# Altium PCB DAPLink GD32F103RCT6.PcbDoc (part 1 of 2)
Units mil, origin at the board's own origin, x right, y up, seen from the top; angles counter-clockwise.
Board outline 3485 x 2855 mil, 2 copper layers (Top Layer, Bottom Layer); 95 components, 93 nets, 322 pads, 225 vias.
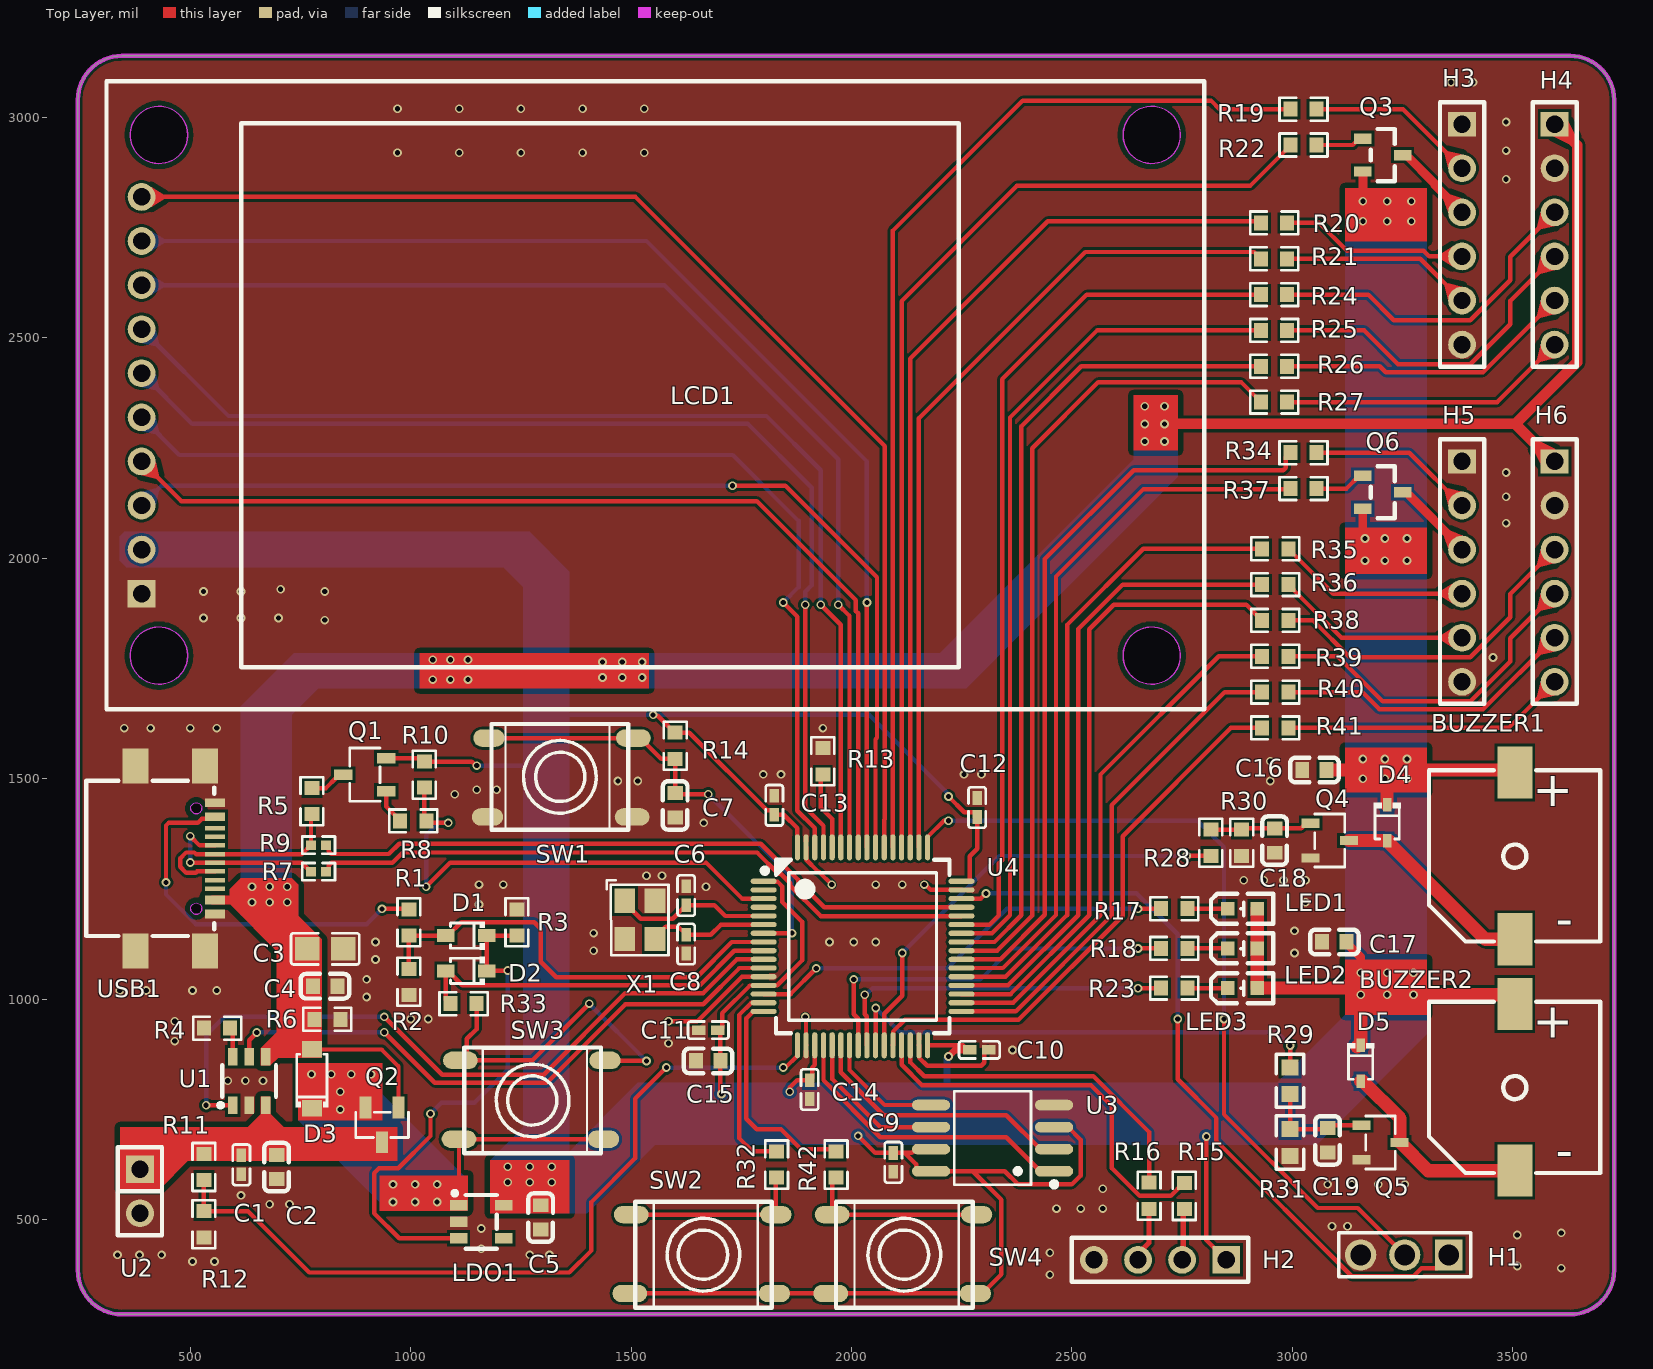
[diagram p0: Top Layer view]
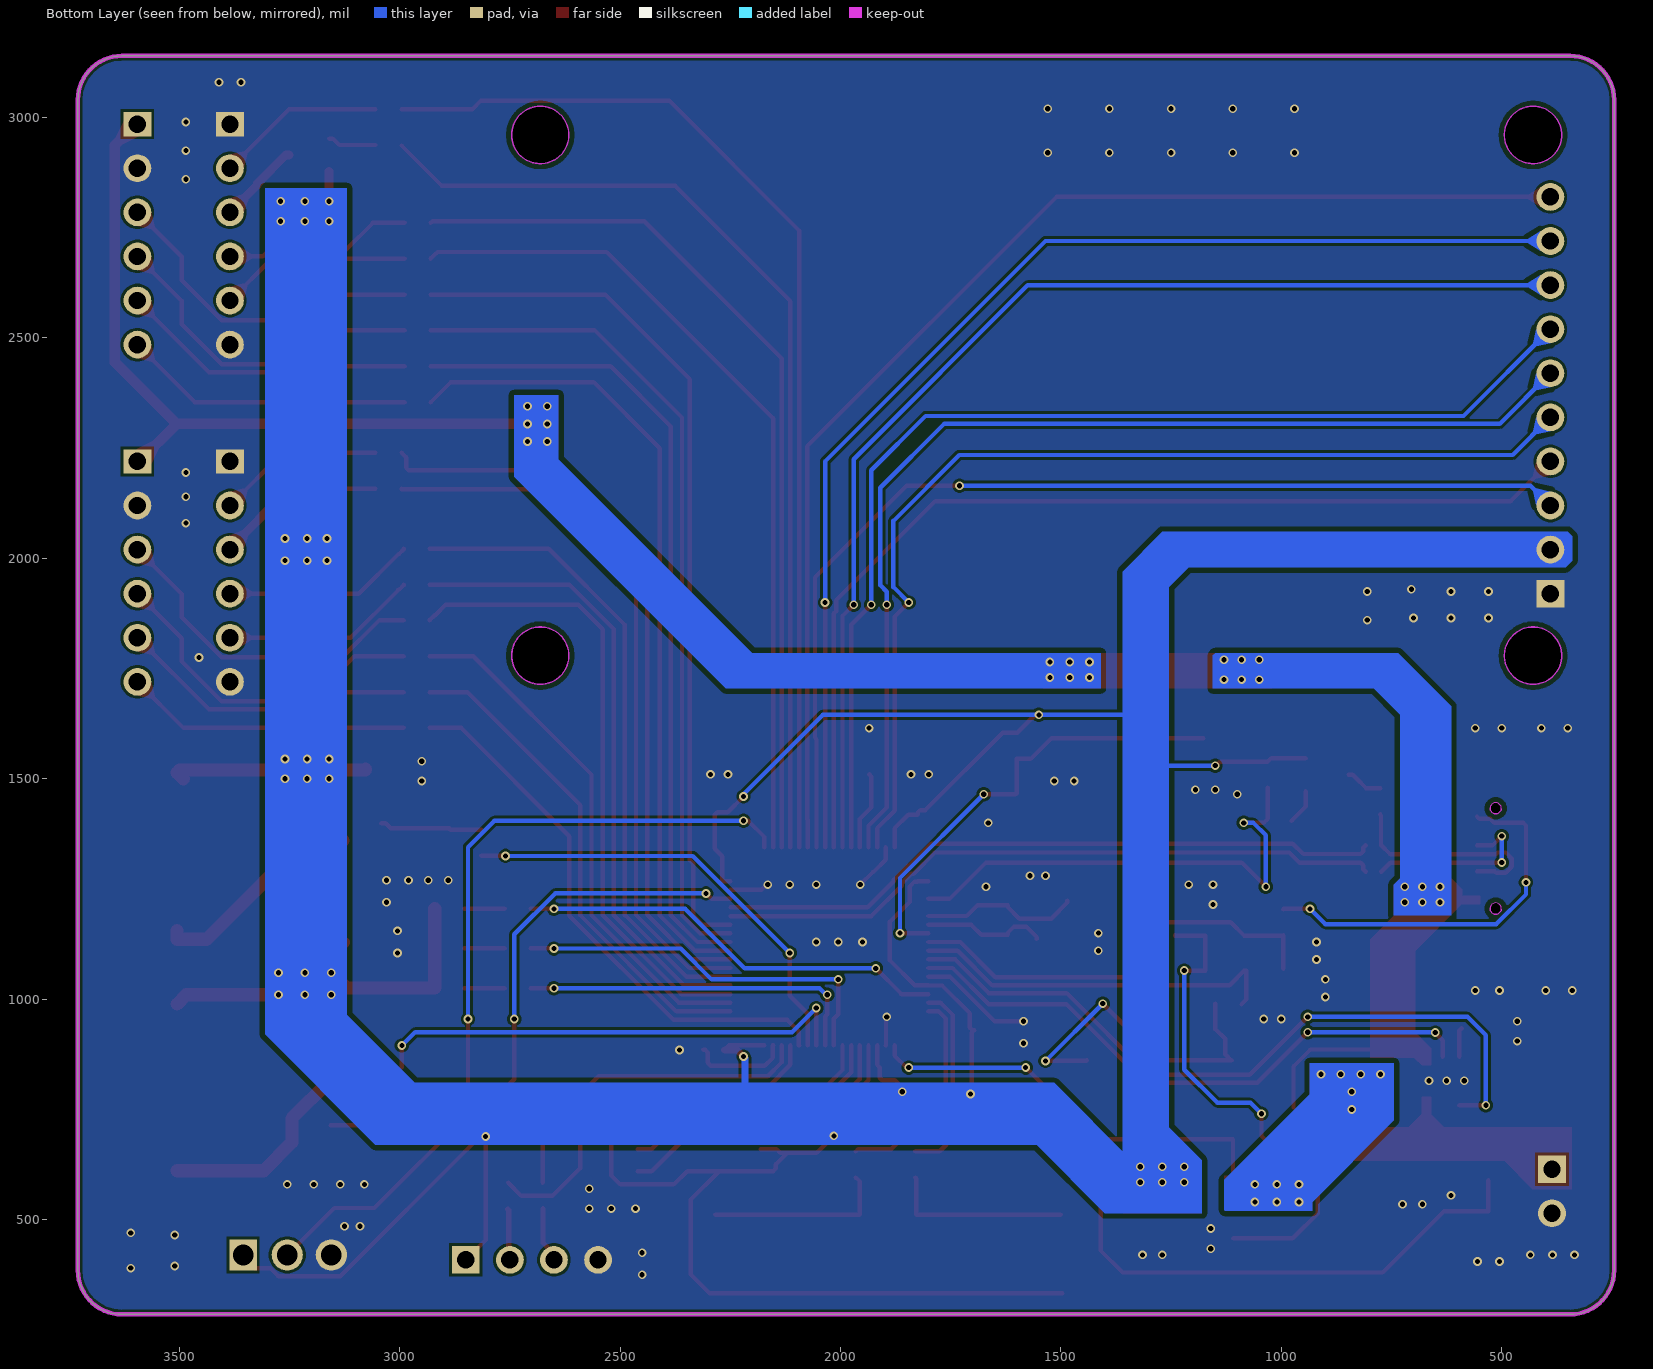
[diagram p1: Bottom Layer view, seen from below]

## Layer stack, top to bottom
Top Solder: solder mask 0.4, Solder Resist, Dk 3.5
Top Layer: signal copper 1.4
Dielectric 1: dielectric 12.6, FR-4, Dk 4.8
Bottom Layer: signal copper 1.4
Bottom Solder: solder mask 0.4, Solder Resist, Dk 3.5

## Board outline
245,385 245,3040 cw(c345,3040) 345,3140 3630,3140 cw(c3630,3040) 3730,3040 3730,385 cw(c3630,385) 3630,285 345,285 cw(c345,385)

## Design rules (kind name [scope] priority, off if disabled: settings)
Clearance Chip [(HasFootprint('USB-C-SMD_TYPE-C-16P-QTGM027') AND HasFootprint('LQFP-64_L10.0-W10.0-P0.50-LS12.0-BL'))] p1: gap=5 ignorepadtopadclearanceinfootprint=TRUE
Clearance [All] p2: gap=6 ignorepadtopadclearanceinfootprint=TRUE except(12: Fill-Fill Fill-Poly Fill-Region Poly-Poly Poly-Region Region-Region)
DiffPairsRouting DiffPair_90oum_DiffPairsRouting [InDifferentialPairClass('90oum')] p1: maxlimit=10 minlimit=7.87 mostfreqgap=10 toplayer_minwidth=10 toplayer_maxwidth=15 toplayer_prefwidth=15 bottomlayer_minwidth=10 bottomlayer_maxwidth=15 bottomlayer_prefwidth=15 maxuncoupledlength=500
DiffPairsRouting [All] p2: maxlimit=10 minlimit=10 mostfreqgap=10 toplayer_minwidth=15 toplayer_maxwidth=15 toplayer_prefwidth=15 bottomlayer_minwidth=15 bottomlayer_maxwidth=15 bottomlayer_prefwidth=15 maxuncoupledlength=500
HoleSize [All] p1: absolutevalues=TRUE maxlimit=248.03 minlimit=7.87 maxpercent=80.000 minpercent=20.000
MatchedLengths DiffPair_90oumMatchedLengths [InDifferentialPairClass('90oum')] p1: tolerance=10 checknetsindiffpair=FALSE checkdiffpairvsdiffpair=TRUE checkxsignals=TRUE checkothers=TRUE
MatchedLengths DiffPair_90oum_MatchedLengths [InDifferentialPairClass('90oum')] p2: tolerance=10 checknetsindiffpair=FALSE checkdiffpairvsdiffpair=TRUE checkxsignals=TRUE checkothers=TRUE
MinimumSolderMaskSliver GD32 [HasFootprint('LQFP-64_L10.0-W10.0-P0.50-LS12.0-BL')] p1: minsoldermaskwidth=3.86
MinimumSolderMaskSliver [All] p2: minsoldermaskwidth=3.94
PolygonConnect [All] p1: connectstyle=Direct reliefconductorwidth=10 reliefentries=4 polygonreliefangle="90 Angle" airgapwidth=10
RoutingVias [All] p1: holewidth=11.81 width=19.68 viastyle="Through Hole" minholewidth=11.81 minwidth=19.68 maxholewidth=28 maxwidth=50
SilkToSolderMaskClearance [IsPad] p1: minsilkscreentomaskgap=4 clearancetoexposedcopper=TRUE
SolderMaskExpansion "Via Mask" [IsVia] p1: expansion=4 istentingtop=TRUE
SolderMaskExpansion [All] p2: expansion=4 istentingtop=FALSE
SupplyNets "Schematic Supply Nets_4" [InNet('GND')] p1: voltage=0.000
SupplyNets "Schematic Supply Nets_3" [InNet('3.3V')] p2: voltage=0.000
SupplyNets "Schematic Supply Nets_2" [InNet('BAT')] p3: voltage=0.000
SupplyNets "Schematic Supply Nets_1" [InNet('5V')] p4: voltage=0.000
SupplyNets "Schematic Supply Nets" [InNet('VCC_BT')] p5: voltage=0.000
Width [All] p1: maxlimit=32 minlimit=4 preferedwidth=10
26 further rules are at their usual default settings.

## Components (designator, comment, footprint, x,y, rotation, side; value= is the part's Value field where it differs from the comment)
BUZZER1 "gsd9605yb-3v2800" BUZ-SMD_GSD9605YB-3V2800 3505,1325 r180 top value=2.7kHz
BUZZER2 "gsd9605yb-3v2800" BUZ-SMD_GSD9605YB-3V2800 3505,800 r180 top value=2.7kHz
C1 "" C0402 615.95,624.4 r90 top value=100nF
C2 "" C0603 695.95,619.4 r90 top value=1uF
C3 "" C0805 805.95,1114.4 r0 top value=1uF
C4 "" C0603 805.95,1029.4 r0 top value=1uF
C5 "" C0603 1295,505 r90 top value=1uF
C6 "" C0402 1625,1235 r270 top value=20pF
C7 "" C0603 1600,1440 r90 top value=100nF
C8 "" C0402 1625,1125 r270 top value=20pF
C9 "" C0402 2095,630 r270 top value=100nF
C10 "" C0402 2290,885 r180 top value=100nF
C11 "" C0402 1675,930 r0 top value=100nF
C12 "" C0402 2285,1435 r270 top value=100nF
C13 "" C0402 1825,1440 r270 top value=100nF
C14 "" C0402 1905,795 r90 top value=100nF
C15 "" C0603 1675,860 r0 top value=1uF
C16 "" C0603 3050,1520 r180 top value=100nF
C17 "" C0603 3095,1130 r180 top value=100nF
C18 "" C0603 2960,1360 r90 top value=100nF
C19 "" C0603 3080,680 r90 top value=100nF
D1 "1N4007WS" SOD-323_L1.8-W1.3-LS2.5-RD 1125.95,1144.4 r180 top
D2 "1N4007WS" SOD-323_L1.8-W1.3-LS2.5-RD 1125.95,1064.4 r180 top
D3 "" SOD-123_L2.8-W1.8-LS3.7-RD 775.95,819.4 r90 top
D4 "1n4148ws_c7420319" SOD-323_L1.7-W1.3-LS2.5-FD 3215,1400 r90 top
D5 "1n4148ws_c7420319" SOD-323_L1.7-W1.3-LS2.5-FD 3155,855 r90 top
H1 "" HDR-TH_3P-P2.54-V-M-1 3255,420 r180 top
H2 "lail-pz2.54-4p-l" CONN-TH_LAIL-PZ2.54-4P-L 2700,408.79 r180 top
H3 "lail-pz2.54-6p-l" CONN-TH_LAIL-PZ2.54-6P-L 3385,2735 r270 top
H4 "lail-pz2.54-6p-l" CONN-TH_LAIL-PZ2.54-6P-L 3595,2735 r270 top
H5 "lail-pz2.54-6p-l" CONN-TH_LAIL-PZ2.54-6P-L 3385,1970 r270 top
H6 "lail-pz2.54-6p-l" CONN-TH_LAIL-PZ2.54-6P-L 3595,1970 r270 top
LCD1 "hs20s010b" LCD-TH_HS20S010B 1555,2370 r90 top
LDO1 "" SOT-23-5_L3.0-W1.7-P0.95-LS2.8-BR 1160,495 r180 top
LED1 "" LED0603-R-RD 2887,1205.3 r0 top
LED2 "" LED0603-R-RD 2887,1115.3 r0 top
LED3 "" LED0603-R-RD 2887,1025.3 r0 top
Q1 "S8550" SOT-23-3_L2.9-W1.6-P1.90-LS2.8-BR 895.95,1509.4 r0 top
Q2 "" SOT-23-3_L2.9-W1.3-P1.90-LS2.4-BR 935,715 r90 top
Q3 "ao3401a_c15127" SOT-23_L2.9-W1.3-P1.90-LS2.4-BR 3205,2915 r180 top
Q4 "ss8050 y1_c42441445" SOT-23-3_L2.9-W1.5-P2.0-LS2.5-BR 3085,1360 r180 top
Q5 "ss8050 y1_c42441445" SOT-23-3_L2.9-W1.5-P2.0-LS2.5-BR 3200,675 r180 top
Q6 "ao3401a_c15127" SOT-23_L2.9-W1.3-P1.90-LS2.4-BR 3205,2150 r180 top
R1 "" R0603#1 995.95,1174.4 r90 top value=5K
R2 "" R0603#1 995.95,1039.4 r90 top value=10K
R3 "" R0603#1 1240.95,1174.4 r270 top value=10K
R4 "" R0603#1 560.95,934.4 r0 top value=1.5K
R5 "" R0603#1 775.95,1449.4 r90 top value=1.5K
R6 "" R0603#1 810.95,954.4 r0 top value=10k
R7 "" R0402 790.95,1289.4 r0 top value=22R
R8 "" R0603#1 1005.95,1404.4 r180 top value=1k
R9 "" R0402 790.95,1349.4 r180 top value=22R
R10 "" R0603#1 1030.95,1509.4 r270 top value=10k
R11 "" R0603#1 530.95,619.4 r90 top value=100K
R12 "" R0603#1 530.95,489.4 r90 top value=200K
R13 "" R0603#1 1935,1540 r270 top value=10k
R14 "" R0603#1 1600,1575 r90 top value=10k
R15 "" R0603#1 2755,553.78 r90 top value=22R
R16 "" R0603#1 2675,554.12 r90 top value=22R
R17 "" R0603#1 2732,1205.3 r0 top value=1k
R18 "" R0603#1 2732,1115.3 r0 top value=1k
R19 "" R0603#1 3025.32,3019 r180 top value=100R
R20 "" R0603#1 2958.78,2761 r180 top value=100R
R21 "" R0603#1 2958.78,2679.71 r180 top value=100R
R22 "" R0603#1 3025.32,2937.71 r180 top value=100R
R23 "" R0603#1 2732,1025.3 r0 top value=1k
R24 "" R0603#1 2958.78,2598.43 r180 top value=1K
R25 "" R0603#1 2958.78,2517.14 r180 top value=1K
R26 "" R0603#1 2958.78,2435.85 r180 top value=1K
R27 "" R0603#1 2958.78,2354.57 r180 top value=1K
R28 "4.7k" R0603#1 2815,1355 r90 top value=1kΩ
R29 "4.7k" R0603#2 2995,815 r90 top value=1kΩ
R30 "3k" R0603#1 2885,1355 r90 top value=1kΩ
R31 "3k" R0603#2 2995,675 r270 top value=1kΩ
R32 "" R0603#1 1830,625 r270 top value=10k
R33 "" R0603#1 1120,990 r0 top value=1k
R34 "" R0603#1 3025.32,2239.75 r180 top value=100R
R35 "" R0603#1 2961.22,2021.85 r180 top value=100R
R36 "" R0603#1 2961.22,1940.56 r180 top value=100R
R37 "" R0603#1 3025.32,2158.46 r180 top value=100R
R38 "" R0603#1 2961.22,1859.28 r180 top value=1K
R39 "" R0603#1 2961.22,1777.99 r180 top value=1K
R40 "" R0603#1 2961.22,1696.71 r180 top value=1K
R41 "" R0603#1 2961.22,1615.42 r180 top value=1K
R42 "" R0603#1 1965,625 r270 top value=10k
SW1 "TS-1002S-07526C" DOT6X6SMT 1340,1505 r0 top
SW2 "TS-1002S-07526C" DOT6X6SMT 1662.47,420 r180 top
SW3 "TS-1002S-07526C" DOT6X6SMT 1275,770 r180 top
SW4 "TS-1002S-07526C" DOT6X6SMT 2118.17,420 r180 top
U1 "TP4059" SOT-23-6_L2.9-W1.6-P0.95-LS2.8-BR 633.55,814.5 r270 top
U2 "" CONN-TH_T2B-SQ-LF-SN 385.95,564.4 r270 top
U3 "" SOP-8_L5.3-W5.2-P1.27-LS7.9-BL 2320,685 r90 top
U4 "gd32f103rct6" LQFP-64_L10.0-W10.0-P0.50-LS12.0-BL 2025,1120 r270 top
USB1 "" USB-C-SMD_TYPE-C-16P-QTGM027 465.95,1319.4 r270 top
X1 "" OSC-SMD_4P-L3.2-W2.5-BL 1520,1180 r270 top value=8MHz

## Footprints (in the part's own frame and the unit in brackets; to place one, negate y for a bottom-side part, rotate by r counter-clockwise, add the part's x,y. Pads: shape width x height; smd on the part's side, far side on the other; paste and mask are expansions set on the pad)
BUZ-SMD_GSD9605YB-3V2800 [mm]
  rect 2x3 smd: 1(0,-4.8) 2(0,4.8)
  silkscreen extent -4.92,-4.94 4.95,4.93
C0402 [mil]
  rect 31.1x21.3 smd paste-3937 mask+2: 1(-21.4,0) 2(21.5,0)
  silkscreen extent -46,-20 46,20
C0603 [mil]
  rect 31.5x35.4 smd paste+0 mask+2: 1(-27.6,0) 2(27.6,0)
  silkscreen extent -55,-28 55,28
C0805 [mil]
  rect 55.5x53.1 smd paste-3937 mask+2: 1(-40.5,0) 2(40.6,0)
  silkscreen extent -77,-36 77,36
CONN-TH_LAIL-PZ2.54-4P-L [mm]
  rect 1.6x1.6 hole 1 paste-2539.97 mask+0.051: 1(-3.81,0)
  round 1.6 hole 1 paste-2539.97 mask+0.051: 2(-1.27,0) 3(1.27,0) 4(3.81,0)
  silkscreen extent -5.08,-1.27 5.08,1.27
CONN-TH_LAIL-PZ2.54-6P-L [mm]
  rect 1.4x1.6 hole 1 paste-2539.97 mask+0.05: 1(-6.35,0)
  round 1.6 hole 1 paste-2539.97 mask+0.05: 2(-3.81,0) 3(-1.27,0) 4(1.27,0) 5(3.81,0) 6(6.35,0)
  silkscreen extent -7.62,-1.27 7.62,1.27
CONN-TH_T2B-SQ-LF-SN [mil]
  rect 63x63 hole 39.4 paste-99999 mask+2: 1(-50,0)
  round 63 hole 39.4 paste-99999 mask+2: 2(50,0)
  silkscreen extent -100,-50 100,50
DOT6X6SMT [mm]
  oval 1.8x1 smd: 1(-4.13,2.22) 3(-4.21,-2.32)
  oval 2x1 smd: 2(4.2,2.22) 4(4.12,-2.32)
  silkscreen extent -3.98,-3.06 3.9,3.04
HDR-TH_3P-P2.54-V-M-1 [mil]
  rect 62x70.9 hole 47.2 paste-99999 mask+2: 1(-100,0)
  round 70.9 hole 47.2 paste-99999 mask+2: 2(0,0) 3(100,0)
  silkscreen extent -150,-50 150,50
LCD-TH_HS20S010B [mm]
  rect 1.6x1.6 hole 1: 1(-11.43,29.6)
  round 1.6 hole 1: 2(-8.89,29.6) 3(-6.35,29.6) 4(-3.81,29.6) 5(-1.27,29.6) 6(1.27,29.6) 7(3.81,29.6) 8(6.35,29.6) 9(8.89,29.6) 10(11.43,29.6)
  Keep-Out Layer board cut-out: -13.35,-28.6 -13.35,-28.693 -13.371,-28.877 -13.412,-29.057 -13.473,-29.232 -13.554,-29.399 -13.652,-29.556 -13.768,-29.701 -13.899,-29.832 -14.044,-29.948 -14.201,-30.046 -14.368,-30.127 -14.542,-30.188 -14.723,-30.229 -14.907,-30.25 -15.093,-30.25 -15.277,-30.229 -15.457,-30.188 -15.632,-30.127 -15.799,-30.046 -15.956,-29.948 -16.101,-29.832 -16.232,-29.701 -16.348,-29.556 -16.446,-29.399 -16.527,-29.232 -16.588,-29.057 -16.629,-28.877 -16.65,-28.693 -16.65,-28.6 -16.65,-28.507 -16.629,-28.323 -16.588,-28.142 -16.527,-27.967 -16.446,-27.8 -16.348,-27.644 -16.232,-27.499 -16.101,-27.368 -15.956,-27.252 -15.799,-27.153 -15.632,-27.073 -15.457,-27.012 -15.277,-26.971 -15.093,-26.95 -14.907,-26.95 -14.723,-26.971 -14.542,-27.012 -14.368,-27.073 -14.201,-27.153 -14.044,-27.252 -13.899,-27.368 -13.768,-27.499 -13.652,-27.644 -13.554,-27.8 -13.473,-27.967 -13.412,-28.142 -13.371,-28.323 -13.35,-28.507 -13.35,-28.6 -13.35,-28.6
  Keep-Out Layer board cut-out: 16.65,-28.6 16.65,-28.693 16.629,-28.877 16.588,-29.057 16.527,-29.232 16.446,-29.399 16.348,-29.556 16.232,-29.701 16.101,-29.832 15.956,-29.948 15.799,-30.046 15.632,-30.127 15.457,-30.188 15.277,-30.229 15.093,-30.25 14.907,-30.25 14.723,-30.229 14.542,-30.188 14.368,-30.127 14.201,-30.046 14.044,-29.948 13.899,-29.832 13.768,-29.701 13.652,-29.556 13.554,-29.399 13.473,-29.232 13.412,-29.057 13.371,-28.877 13.35,-28.693 13.35,-28.6 13.35,-28.507 13.371,-28.323 13.412,-28.142 13.473,-27.967 13.554,-27.8 13.652,-27.644 13.768,-27.499 13.899,-27.368 14.044,-27.252 14.201,-27.153 14.368,-27.073 14.542,-27.012 14.723,-26.971 14.907,-26.95 15.093,-26.95 15.277,-26.971 15.457,-27.012 15.632,-27.073 15.799,-27.153 15.956,-27.252 16.101,-27.368 16.232,-27.499 16.348,-27.644 16.446,-27.8 16.527,-27.967 16.588,-28.142 16.629,-28.323 16.65,-28.507 16.65,-28.6 16.65,-28.6
  Keep-Out Layer board cut-out: 16.65,28.6 16.65,28.507 16.629,28.323 16.588,28.142 16.527,27.967 16.446,27.8 16.348,27.644 16.232,27.499 16.101,27.368 15.956,27.252 15.799,27.153 15.632,27.073 15.457,27.012 15.277,26.971 15.093,26.95 14.907,26.95 14.723,26.971 14.542,27.012 14.368,27.073 14.201,27.153 14.044,27.252 13.899,27.368 13.768,27.499 13.652,27.644 13.554,27.8 13.473,27.967 13.412,28.142 13.371,28.323 13.35,28.507 13.35,28.6 13.35,28.693 13.371,28.877 13.412,29.057 13.473,29.232 13.554,29.399 13.652,29.556 13.768,29.701 13.899,29.832 14.044,29.948 14.201,30.046 14.368,30.127 14.542,30.188 14.723,30.229 14.907,30.25 15.093,30.25 15.277,30.229 15.457,30.188 15.632,30.127 15.799,30.046 15.956,29.948 16.101,29.832 16.232,29.701 16.348,29.556 16.446,29.399 16.527,29.232 16.588,29.057 16.629,28.877 16.65,28.693 16.65,28.6 16.65,28.6
  Keep-Out Layer board cut-out: -13.35,28.6 -13.35,28.507 -13.371,28.323 -13.412,28.142 -13.473,27.967 -13.554,27.8 -13.652,27.644 -13.768,27.499 -13.899,27.368 -14.044,27.252 -14.201,27.153 -14.368,27.073 -14.542,27.012 -14.723,26.971 -14.907,26.95 -15.093,26.95 -15.277,26.971 -15.457,27.012 -15.632,27.073 -15.799,27.153 -15.956,27.252 -16.101,27.368 -16.232,27.499 -16.348,27.644 -16.446,27.8 -16.527,27.967 -16.588,28.142 -16.629,28.323 -16.65,28.507 -16.65,28.6 -16.65,28.693 -16.629,28.877 -16.588,29.057 -16.527,29.232 -16.446,29.399 -16.348,29.556 -16.232,29.701 -16.101,29.832 -15.956,29.948 -15.799,30.046 -15.632,30.127 -15.457,30.188 -15.277,30.229 -15.093,30.25 -14.907,30.25 -14.723,30.229 -14.542,30.188 -14.368,30.127 -14.201,30.046 -14.044,29.948 -13.899,29.832 -13.768,29.701 -13.652,29.556 -13.554,29.399 -13.473,29.232 -13.412,29.057 -13.371,28.877 -13.35,28.693 -13.35,28.6 -13.35,28.6
  Keep-Out Layer circle w0.003: c-15,-28.6 r1.65
  Keep-Out Layer circle w0.003: c15,-28.6 r1.65
  Keep-Out Layer circle w0.003: c15,28.6 r1.65
  Keep-Out Layer circle w0.003: c-15,28.6 r1.65
  Keep-Out Layer region: -13.35,-28.6 -13.36,-28.778 -13.389,-28.955 -13.436,-29.127 -13.502,-29.293 -13.586,-29.451 -13.686,-29.598 -13.802,-29.735 -13.932,-29.857 -14.074,-29.966 -14.227,-30.058 -14.389,-30.133 -14.559,-30.19 -14.733,-30.228 -14.911,-30.247 -15.089,-30.247 -15.267,-30.228 -15.441,-30.19 -15.611,-30.133 -15.773,-30.058 -15.926,-29.966 -16.068,-29.857 -16.198,-29.735 -16.314,-29.598 -16.414,-29.451 -16.497,-29.293 -16.564,-29.127 -16.611,-28.955 -16.64,-28.778 -16.65,-28.6 -16.64,-28.421 -16.611,-28.245 -16.564,-28.073 -16.497,-27.907 -16.414,-27.749 -16.314,-27.601 -16.198,-27.465 -16.068,-27.342 -15.926,-27.234 -15.773,-27.142 -15.611,-27.067 -15.441,-27.01 -15.267,-26.972 -15.089,-26.952 -14.911,-26.952 -14.733,-26.972 -14.559,-27.01 -14.389,-27.067 -14.227,-27.142 -14.074,-27.234 -13.932,-27.342 -13.802,-27.465 -13.686,-27.601 -13.586,-27.749 -13.502,-27.907 -13.436,-28.073 -13.389,-28.245 -13.36,-28.421 -13.35,-28.6
  Keep-Out Layer region: -13.35,-28.6 -13.35,-28.693 -13.371,-28.877 -13.412,-29.057 -13.473,-29.232 -13.554,-29.399 -13.652,-29.556 -13.768,-29.701 -13.899,-29.832 -14.044,-29.948 -14.201,-30.046 -14.368,-30.127 -14.542,-30.188 -14.723,-30.229 -14.907,-30.25 -15.093,-30.25 -15.277,-30.229 -15.457,-30.188 -15.632,-30.127 -15.799,-30.046 -15.956,-29.948 -16.101,-29.832 -16.232,-29.701 -16.348,-29.556 -16.446,-29.399 -16.527,-29.232 -16.588,-29.057 -16.629,-28.877 -16.65,-28.693 -16.65,-28.6 -16.65,-28.507 -16.629,-28.323 -16.588,-28.142 -16.527,-27.967 -16.446,-27.8 -16.348,-27.644 -16.232,-27.499 -16.101,-27.368 -15.956,-27.252 -15.799,-27.153 -15.632,-27.073 -15.457,-27.012 -15.277,-26.971 -15.093,-26.95 -14.907,-26.95 -14.723,-26.971 -14.542,-27.012 -14.368,-27.073 -14.201,-27.153 -14.044,-27.252 -13.899,-27.368 -13.768,-27.499 -13.652,-27.644 -13.554,-27.8 -13.473,-27.967 -13.412,-28.142 -13.371,-28.323 -13.35,-28.507 -13.35,-28.6 -13.35,-28.6
  Keep-Out Layer region: 16.65,-28.6 16.64,-28.778 16.611,-28.955 16.564,-29.127 16.498,-29.293 16.414,-29.451 16.314,-29.598 16.198,-29.735 16.068,-29.857 15.926,-29.966 15.773,-30.058 15.611,-30.133 15.441,-30.19 15.267,-30.228 15.089,-30.247 14.911,-30.247 14.733,-30.228 14.559,-30.19 14.389,-30.133 14.227,-30.058 14.074,-29.966 13.932,-29.857 13.802,-29.735 13.686,-29.598 13.586,-29.451 13.502,-29.293 13.436,-29.127 13.389,-28.955 13.36,-28.778 13.35,-28.6 13.36,-28.421 13.389,-28.245 13.436,-28.073 13.502,-27.907 13.586,-27.749 13.686,-27.601 13.802,-27.465 13.932,-27.342 14.074,-27.234 14.227,-27.142 14.389,-27.067 14.559,-27.01 14.733,-26.972 14.911,-26.952 15.089,-26.952 15.267,-26.972 15.441,-27.01 15.611,-27.067 15.773,-27.142 15.926,-27.234 16.068,-27.342 16.198,-27.465 16.314,-27.601 16.414,-27.749 16.498,-27.907 16.564,-28.073 16.611,-28.245 16.64,-28.421 16.65,-28.6
  Keep-Out Layer region: 16.65,-28.6 16.65,-28.693 16.629,-28.877 16.588,-29.057 16.527,-29.232 16.446,-29.399 16.348,-29.556 16.232,-29.701 16.101,-29.832 15.956,-29.948 15.799,-30.046 15.632,-30.127 15.457,-30.188 15.277,-30.229 15.093,-30.25 14.907,-30.25 14.723,-30.229 14.542,-30.188 14.368,-30.127 14.201,-30.046 14.044,-29.948 13.899,-29.832 13.768,-29.701 13.652,-29.556 13.554,-29.399 13.473,-29.232 13.412,-29.057 13.371,-28.877 13.35,-28.693 13.35,-28.6 13.35,-28.507 13.371,-28.323 13.412,-28.142 13.473,-27.967 13.554,-27.8 13.652,-27.644 13.768,-27.499 13.899,-27.368 14.044,-27.252 14.201,-27.153 14.368,-27.073 14.542,-27.012 14.723,-26.971 14.907,-26.95 15.093,-26.95 15.277,-26.971 15.457,-27.012 15.632,-27.073 15.799,-27.153 15.956,-27.252 16.101,-27.368 16.232,-27.499 16.348,-27.644 16.446,-27.8 16.527,-27.967 16.588,-28.142 16.629,-28.323 16.65,-28.507 16.65,-28.6 16.65,-28.6
  Keep-Out Layer region: 16.65,28.6 16.64,28.421 16.611,28.245 16.564,28.073 16.498,27.907 16.414,27.749 16.314,27.601 16.198,27.465 16.068,27.342 15.926,27.234 15.773,27.142 15.611,27.067 15.441,27.01 15.267,26.972 15.089,26.952 14.911,26.952 14.733,26.972 14.559,27.01 14.389,27.067 14.227,27.142 14.074,27.234 13.932,27.342 13.802,27.465 13.686,27.601 13.586,27.749 13.502,27.907 13.436,28.073 13.389,28.245 13.36,28.421 13.35,28.6 13.36,28.778 13.389,28.955 13.436,29.127 13.502,29.293 13.586,29.451 13.686,29.598 13.802,29.735 13.932,29.857 14.074,29.966 14.227,30.058 14.389,30.133 14.559,30.19 14.733,30.228 14.911,30.247 15.089,30.247 15.267,30.228 15.441,30.19 15.611,30.133 15.773,30.058 15.926,29.966 16.068,29.857 16.198,29.735 16.314,29.598 16.414,29.451 16.498,29.293 16.564,29.127 16.611,28.955 16.64,28.778 16.65,28.6
  Keep-Out Layer region: 16.65,28.6 16.65,28.507 16.629,28.323 16.588,28.142 16.527,27.967 16.446,27.8 16.348,27.644 16.232,27.499 16.101,27.368 15.956,27.252 15.799,27.153 15.632,27.073 15.457,27.012 15.277,26.971 15.093,26.95 14.907,26.95 14.723,26.971 14.542,27.012 14.368,27.073 14.201,27.153 14.044,27.252 13.899,27.368 13.768,27.499 13.652,27.644 13.554,27.8 13.473,27.967 13.412,28.142 13.371,28.323 13.35,28.507 13.35,28.6 13.35,28.693 13.371,28.877 13.412,29.057 13.473,29.232 13.554,29.399 13.652,29.556 13.768,29.701 13.899,29.832 14.044,29.948 14.201,30.046 14.368,30.127 14.542,30.188 14.723,30.229 14.907,30.25 15.093,30.25 15.277,30.229 15.457,30.188 15.632,30.127 15.799,30.046 15.956,29.948 16.101,29.832 16.232,29.701 16.348,29.556 16.446,29.399 16.527,29.232 16.588,29.057 16.629,28.877 16.65,28.693 16.65,28.6 16.65,28.6
  Keep-Out Layer region: -13.35,28.6 -13.36,28.421 -13.389,28.245 -13.436,28.073 -13.502,27.907 -13.586,27.749 -13.686,27.601 -13.802,27.465 -13.932,27.342 -14.074,27.234 -14.227,27.142 -14.389,27.067 -14.559,27.01 -14.733,26.972 -14.911,26.952 -15.089,26.952 -15.267,26.972 -15.441,27.01 -15.611,27.067 -15.773,27.142 -15.926,27.234 -16.068,27.342 -16.198,27.465 -16.314,27.601 -16.414,27.749 -16.497,27.907 -16.564,28.073 -16.611,28.245 -16.64,28.421 -16.65,28.6 -16.64,28.778 -16.611,28.955 -16.564,29.127 -16.497,29.293 -16.414,29.451 -16.314,29.598 -16.198,29.735 -16.068,29.857 -15.926,29.966 -15.773,30.058 -15.611,30.133 -15.441,30.19 -15.267,30.228 -15.089,30.247 -14.911,30.247 -14.733,30.228 -14.559,30.19 -14.389,30.133 -14.227,30.058 -14.074,29.966 -13.932,29.857 -13.802,29.735 -13.686,29.598 -13.586,29.451 -13.502,29.293 -13.436,29.127 -13.389,28.955 -13.36,28.778 -13.35,28.6
  Keep-Out Layer region: -13.35,28.6 -13.35,28.507 -13.371,28.323 -13.412,28.142 -13.473,27.967 -13.554,27.8 -13.652,27.644 -13.768,27.499 -13.899,27.368 -14.044,27.252 -14.201,27.153 -14.368,27.073 -14.542,27.012 -14.723,26.971 -14.907,26.95 -15.093,26.95 -15.277,26.971 -15.457,27.012 -15.632,27.073 -15.799,27.153 -15.956,27.252 -16.101,27.368 -16.232,27.499 -16.348,27.644 -16.446,27.8 -16.527,27.967 -16.588,28.142 -16.629,28.323 -16.65,28.507 -16.65,28.6 -16.65,28.693 -16.629,28.877 -16.588,29.057 -16.527,29.232 -16.446,29.399 -16.348,29.556 -16.232,29.701 -16.101,29.832 -15.956,29.948 -15.799,30.046 -15.632,30.127 -15.457,30.188 -15.277,30.229 -15.093,30.25 -14.907,30.25 -14.723,30.229 -14.542,30.188 -14.368,30.127 -14.201,30.046 -14.044,29.948 -13.899,29.832 -13.768,29.701 -13.652,29.556 -13.554,29.399 -13.473,29.232 -13.412,29.057 -13.371,28.877 -13.35,28.693 -13.35,28.6 -13.35,28.6
  silkscreen extent -18.1,-31.62 18.1,31.62
LED0603-R-RD [mil]
  rect 31.5x31.5 smd paste+0 mask+2: 1(33.5,0) 2(-33.5,0)
  silkscreen extent -72,-34 70,34
LQFP-64_L10.0-W10.0-P0.50-LS12.0-BL [mm]
  oval 0.3x1.5 smd paste+0 mask+0.051: 1(-3.75,-5.7) 2(-3.25,-5.7) 3(-2.75,-5.7) 4(-2.25,-5.7) 5(-1.75,-5.7) 6(-1.25,-5.7) 7(-0.75,-5.7) 8(-0.25,-5.7) 9(0.25,-5.7) 10(0.75,-5.7) 11(1.25,-5.7) 12(1.75,-5.7) 13(2.25,-5.7) 14(2.75,-5.7) 15(3.25,-5.7) 16(3.75,-5.7) 33(3.75,5.7) 34(3.25,5.7) 35(2.75,5.7) 36(2.25,5.7) 37(1.75,5.7) 38(1.25,5.7) 39(0.75,5.7) 40(0.25,5.7) 41(-0.25,5.7) 42(-0.75,5.7) 43(-1.25,5.7) 44(-1.75,5.7) 45(-2.25,5.7) 46(-2.75,5.7) 47(-3.25,5.7) 48(-3.75,5.7)
  oval 1.5x0.3 smd paste+0 mask+0.051: 17(5.7,-3.75) 18(5.7,-3.25) 19(5.7,-2.75) 20(5.7,-2.25) 21(5.7,-1.75) 22(5.7,-1.25) 23(5.7,-0.75) 24(5.7,-0.25) 25(5.7,0.25) 26(5.7,0.75) 27(5.7,1.25) 28(5.7,1.75) 29(5.7,2.25) 30(5.7,2.75) 31(5.7,3.25) 32(5.7,3.75) 49(-5.7,3.75) 50(-5.7,3.25) 51(-5.7,2.75) 52(-5.7,2.25) 53(-5.7,1.75) 54(-5.7,1.25) 55(-5.7,0.75) 56(-5.7,0.25) 57(-5.7,-0.25) 58(-5.7,-0.75) 59(-5.7,-1.25) 60(-5.7,-1.75) 61(-5.7,-2.25) 62(-5.7,-2.75) 63(-5.7,-3.25) 64(-5.7,-3.75)
  silkscreen extent -5,-5.78 5,5.01
OSC-SMD_4P-L3.2-W2.5-BL [mil]
  rect 55.1x47.2 smd paste+0 mask+2: 1(-43.4,-34.5) 2(43.3,-34.5) 3(43.3,34.4) 4(-43.4,34.4)
  silkscreen extent -90,-75 80,65
R0402 [mil]
  rect 22.3x21.3 smd paste-3937 mask+2: 1(-17.1,0) 2(17,0)
  silkscreen extent -37,-20 37,20
R0603#1 [mil]
  rect 31.75x34.02 smd paste-3937.01 mask+2: 1(-29.66,0) 2(29.66,0)
  silkscreen extent -55,-26 55,26
R0603#2 [mil]
  rect 36.61x38.58 smd: 1(30.31,0) 2(-30.32,0)
  silkscreen extent -60,-31 60,31, body extent -33,-16 33,16, height 22
SOD-123_L2.8-W1.8-LS3.7-RD [mil]
  rect 37.4x45.3 smd paste+0 mask+2: 1(-66.6,0) 2(66.6,0)
  silkscreen extent -64,-37 55,37
SOD-323_L1.7-W1.3-LS2.5-FD [mm]
  rect 0.78x0.5 smd: 1(-1.04,0) 2(1.04,0)
  silkscreen extent -0.93,-0.78 1.15,0.78
SOD-323_L1.8-W1.3-LS2.5-RD [mil]
  rect 39.4x29.5 smd paste+0 mask+2: 1(-46.2,0) 2(46.2,0)
  silkscreen extent -43,-32 36,32
SOP-8_L5.3-W5.2-P1.27-LS7.9-BL [mil]
  oval 24x86.8 smd paste+0 mask+2: 1(-75,-139.5) 2(-25,-139.5) 3(25,-139.5) 4(75,-139.5) 5(75,139.5) 6(25,139.5) 7(-25,139.5) 8(-75,139.5)
  silkscreen extent -111,-145 106,87
SOT-23-3_L2.9-W1.3-P1.90-LS2.4-BR [mil]
  rect 49.2x27.6 smd paste+0 mask+2: 1(39.4,-37.4) 2(39.4,37.4) 3(-39.4,0)
  silkscreen extent -29,-60 29,60
SOT-23-3_L2.9-W1.5-P2.0-LS2.5-BR [mm]
  rect 1.037x0.532 smd: 1(1.101,-1) 2(1.101,1) 3(-1.101,0)
  silkscreen extent -0.86,-1.53 0.86,1.53
SOT-23-3_L2.9-W1.6-P1.90-LS2.8-BR [mil]
  rect 42.1x23.6 smd paste+0 mask+2: 1(48.6,-37.4) 2(48.6,37.4) 3(-48.6,0)
  silkscreen extent -34,-60 34,60
SOT-23-5_L3.0-W1.7-P0.95-LS2.8-BR [mil]
  rect 39.4x23.6 smd paste+0 mask+2: 1(51.2,-37.4) 2(51.2,0) 3(51.2,37.4) 4(-51.2,37.4) 5(-51.2,-37.4)
  silkscreen extent -35,-70 65,61
SOT-23-6_L2.9-W1.6-P0.95-LS2.8-BR [mil]
  rect 39.4x21.7 smd paste+0 mask+2: 1(55.1,-37.4) 2(55.1,0) 3(55.1,37.4) 4(-55.1,37.4) 5(-55.1,0) 6(-55.1,-37.4)
  silkscreen extent -35,-70 60,61
SOT-23_L2.9-W1.3-P1.90-LS2.4-BR [mm]
  rect 1x0.6 smd paste+0 mask+0.051: 1(1.15,-0.95) 2(1.15,0.95) 3(-1.15,0)
  silkscreen extent -0.7,-1.5 0.7,1.5
USB-C-SMD_TYPE-C-16P-QTGM027 [mil]
  rect 79.5x59.1 smd paste+0 mask+2: 17(209.8,67.4) 18(209.8,-90) 19(-209.8,-90) 20(-209.8,67.4)
  rect 19.7x45.3 smd paste+0 mask+2: A1(-126,90.1) A4(-94.5,90.1) A9(94.5,90.1) A12(126,90.1)
  rect 10.2x45.3 smd paste+0 mask+2: A5(-49.2,90.1) A6(-9.8,90.1) A7(9.8,90.1) A8(49.2,90.1) B5(68.9,90.1) B6(29.5,90.1) B7(-29.5,90.1) B8(-68.9,90.1)
  Keep-Out Layer board cut-out: 126.6,47.7 126.3,44.6 125.2,41.8 123.4,39.2 121.1,37.2 118.4,35.7 115.4,35 112.3,35 109.3,35.7 106.6,37.2 104.3,39.2 102.5,41.8 101.4,44.6 101,47.7 101.4,50.8 102.5,53.6 104.3,56.2 106.6,58.2 109.3,59.7 112.3,60.4 115.4,60.4 118.4,59.7 121.1,58.2 123.4,56.2 125.2,53.6 126.3,50.8 126.6,47.7
  Keep-Out Layer board cut-out: -101,47.7 -101.3,44.6 -102.4,41.8 -104.2,39.2 -106.5,37.2 -109.2,35.7 -112.2,35 -115.3,35 -118.3,35.7 -121,37.2 -123.3,39.2 -125.1,41.8 -126.2,44.6 -126.6,47.7 -126.2,50.8 -125.1,53.6 -123.3,56.2 -121,58.2 -118.3,59.7 -115.3,60.4 -112.2,60.4 -109.2,59.7 -106.5,58.2 -104.2,56.2 -102.4,53.6 -101.3,50.8 -101,47.7
  Keep-Out Layer region: 126.6,47.7 126.3,44.6 125.2,41.8 123.4,39.2 121.1,37.2 118.4,35.7 115.4,35 112.3,35 109.3,35.7 106.6,37.2 104.3,39.2 102.5,41.8 101.4,44.6 101,47.7 101.4,50.8 102.5,53.6 104.3,56.2 106.6,58.2 109.3,59.7 112.3,60.4 115.4,60.4 118.4,59.7 121.1,58.2 123.4,56.2 125.2,53.6 126.3,50.8 126.6,47.7
  Keep-Out Layer region: 126.6,47.7 126.3,44.6 125.2,41.8 123.4,39.2 121.1,37.2 118.4,35.7 115.4,35 112.3,35 109.3,35.7 106.6,37.2 104.3,39.2 102.5,41.8 101.4,44.6 101,47.7 101.4,50.8 102.5,53.6 104.3,56.2 106.6,58.2 109.3,59.7 112.3,60.4 115.4,60.4 118.4,59.7 121.1,58.2 123.4,56.2 125.2,53.6 126.3,50.8 126.6,47.7
  Keep-Out Layer region: -101,47.7 -101.3,44.6 -102.4,41.8 -104.2,39.2 -106.5,37.2 -109.2,35.7 -112.2,35 -115.3,35 -118.3,35.7 -121,37.2 -123.3,39.2 -125.1,41.8 -126.2,44.6 -126.6,47.7 -126.2,50.8 -125.1,53.6 -123.3,56.2 -121,58.2 -118.3,59.7 -115.3,60.4 -112.2,60.4 -109.2,59.7 -106.5,58.2 -104.2,56.2 -102.4,53.6 -101.3,50.8 -101,47.7
  Keep-Out Layer region: -101,47.7 -101.3,44.6 -102.4,41.8 -104.2,39.2 -106.5,37.2 -109.2,35.7 -112.2,35 -115.3,35 -118.3,35.7 -121,37.2 -123.3,39.2 -125.1,41.8 -126.2,44.6 -126.6,47.7 -126.2,50.8 -125.1,53.6 -123.3,56.2 -121,58.2 -118.3,59.7 -115.3,60.4 -112.2,60.4 -109.2,59.7 -106.5,58.2 -104.2,56.2 -102.4,53.6 -101.3,50.8 -101,47.7
  Keep-Out Layer lines w0.1: 115.4,35 112.3,35 109.3,35.7 106.6,37.2 104.3,39.2 102.5,41.8 101.4,44.6 101,47.7 101.4,50.8 102.5,53.6 104.3,56.2 106.6,58.2 109.3,59.7 112.3,60.4 115.4,60.4 118.4,59.7 121.1,58.2 123.4,56.2 125.2,53.6 126.3,50.8 126.6,47.7 126.3,44.6 125.2,41.8 123.4,39.2 121.1,37.2 118.4,35.7 115.4,35 ; -112.2,35 -115.3,35 -118.3,35.7 -121,37.2 -123.3,39.2 -125.1,41.8 -126.2,44.6 -126.6,47.7 -126.2,50.8 -125.1,53.6 -123.3,56.2 -121,58.2 -118.3,59.7 -115.3,60.4 -112.2,60.4 -109.2,59.7 -106.5,58.2 -104.2,56.2 -102.4,53.6 -101.3,50.8 -101,47.7 -101.3,44.6 -102.4,41.8 -104.2,39.2 -106.5,37.2 -109.2,35.7 -112.2,35
  silkscreen extent -176,-202 176,88